# Altium PCB AVR Test Hat.PcbDoc
Units mm, origin at the board's own origin, x right, y up, seen from the top; angles counter-clockwise.
Board outline 65 x 56 mm, 2 copper layers (Top Layer, Bottom Layer), stack 1.58 mm thick; 65 components, 70 nets, 304 pads, 155 vias.
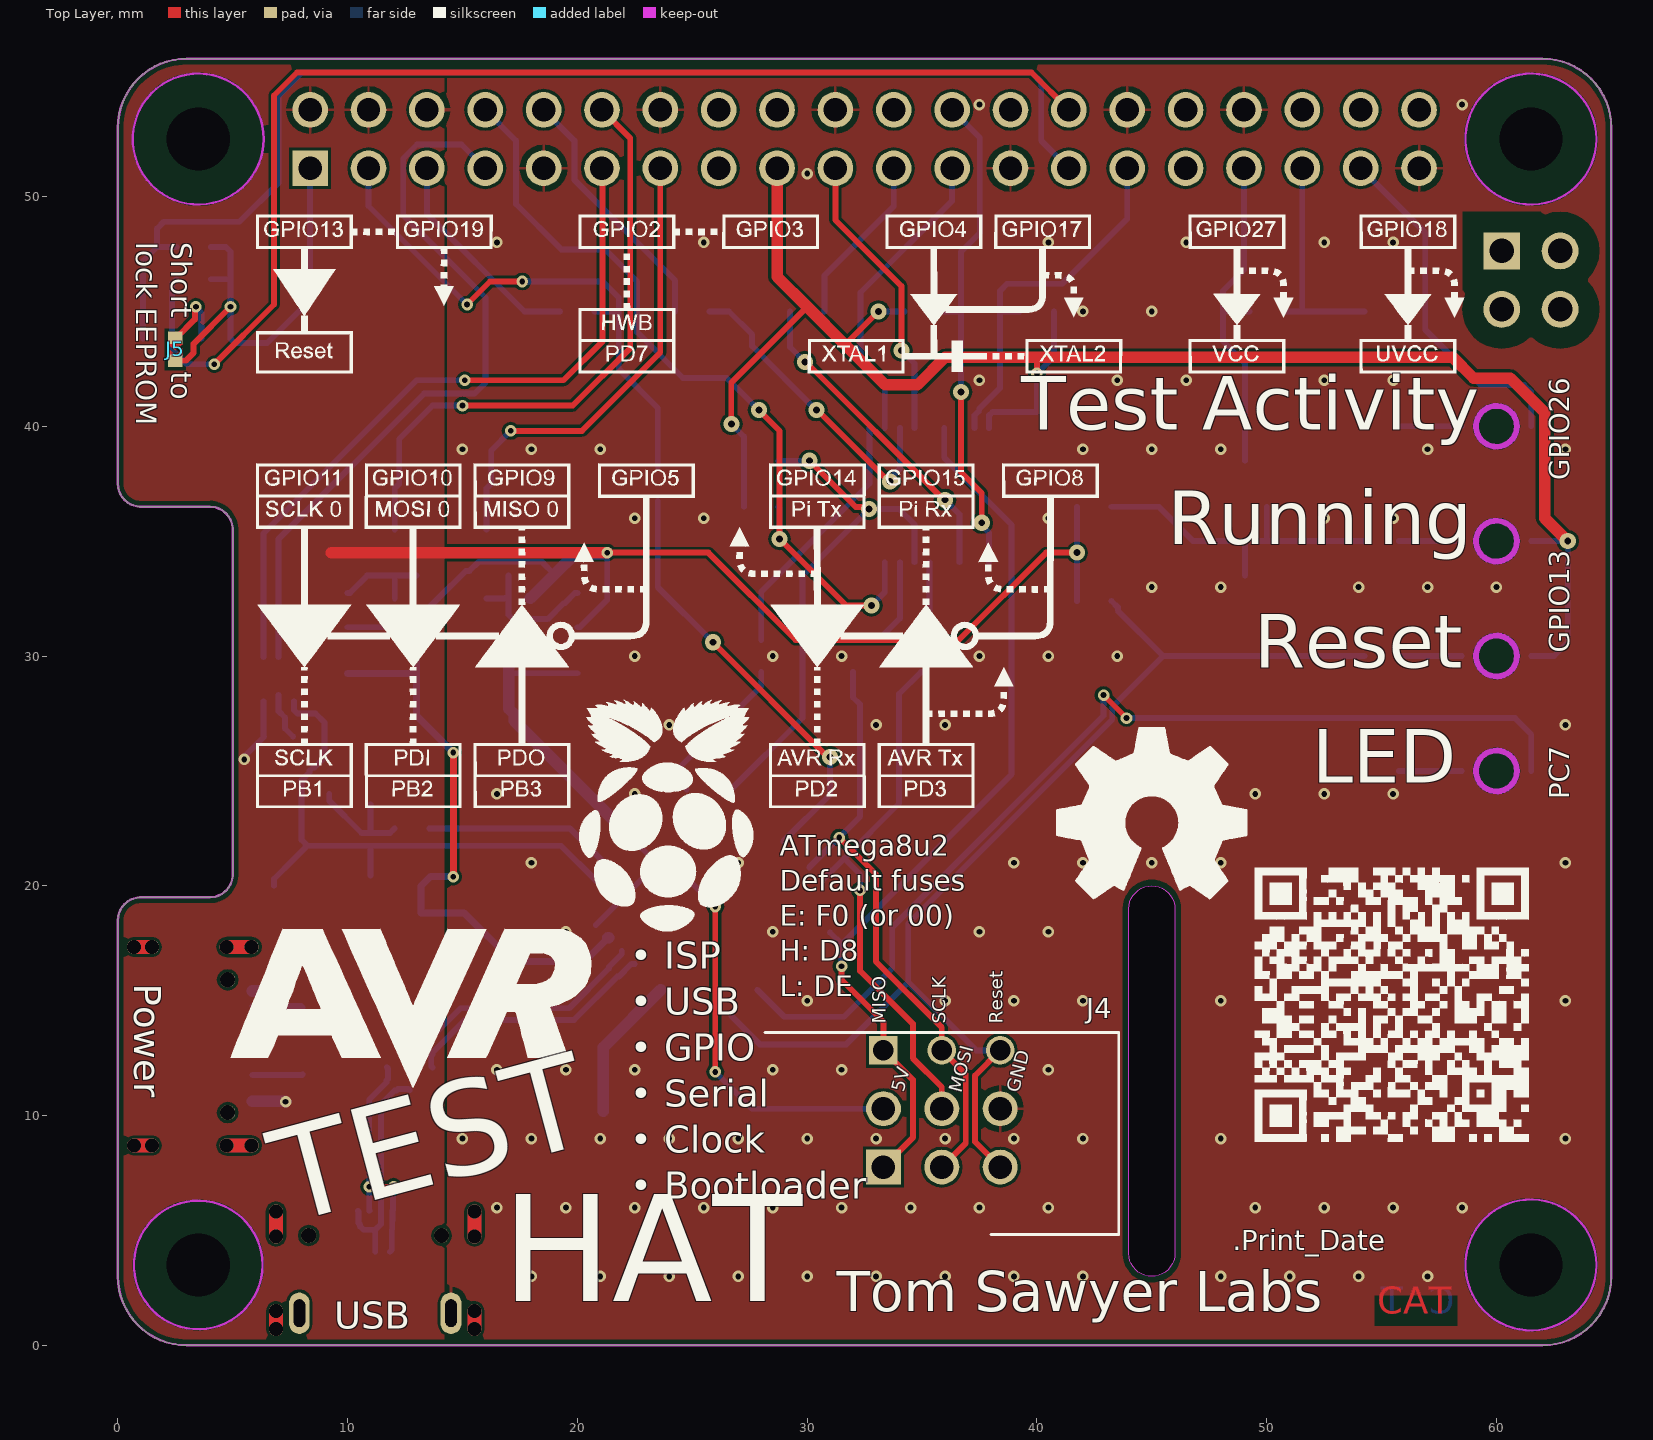
[diagram p0: Top Layer view]
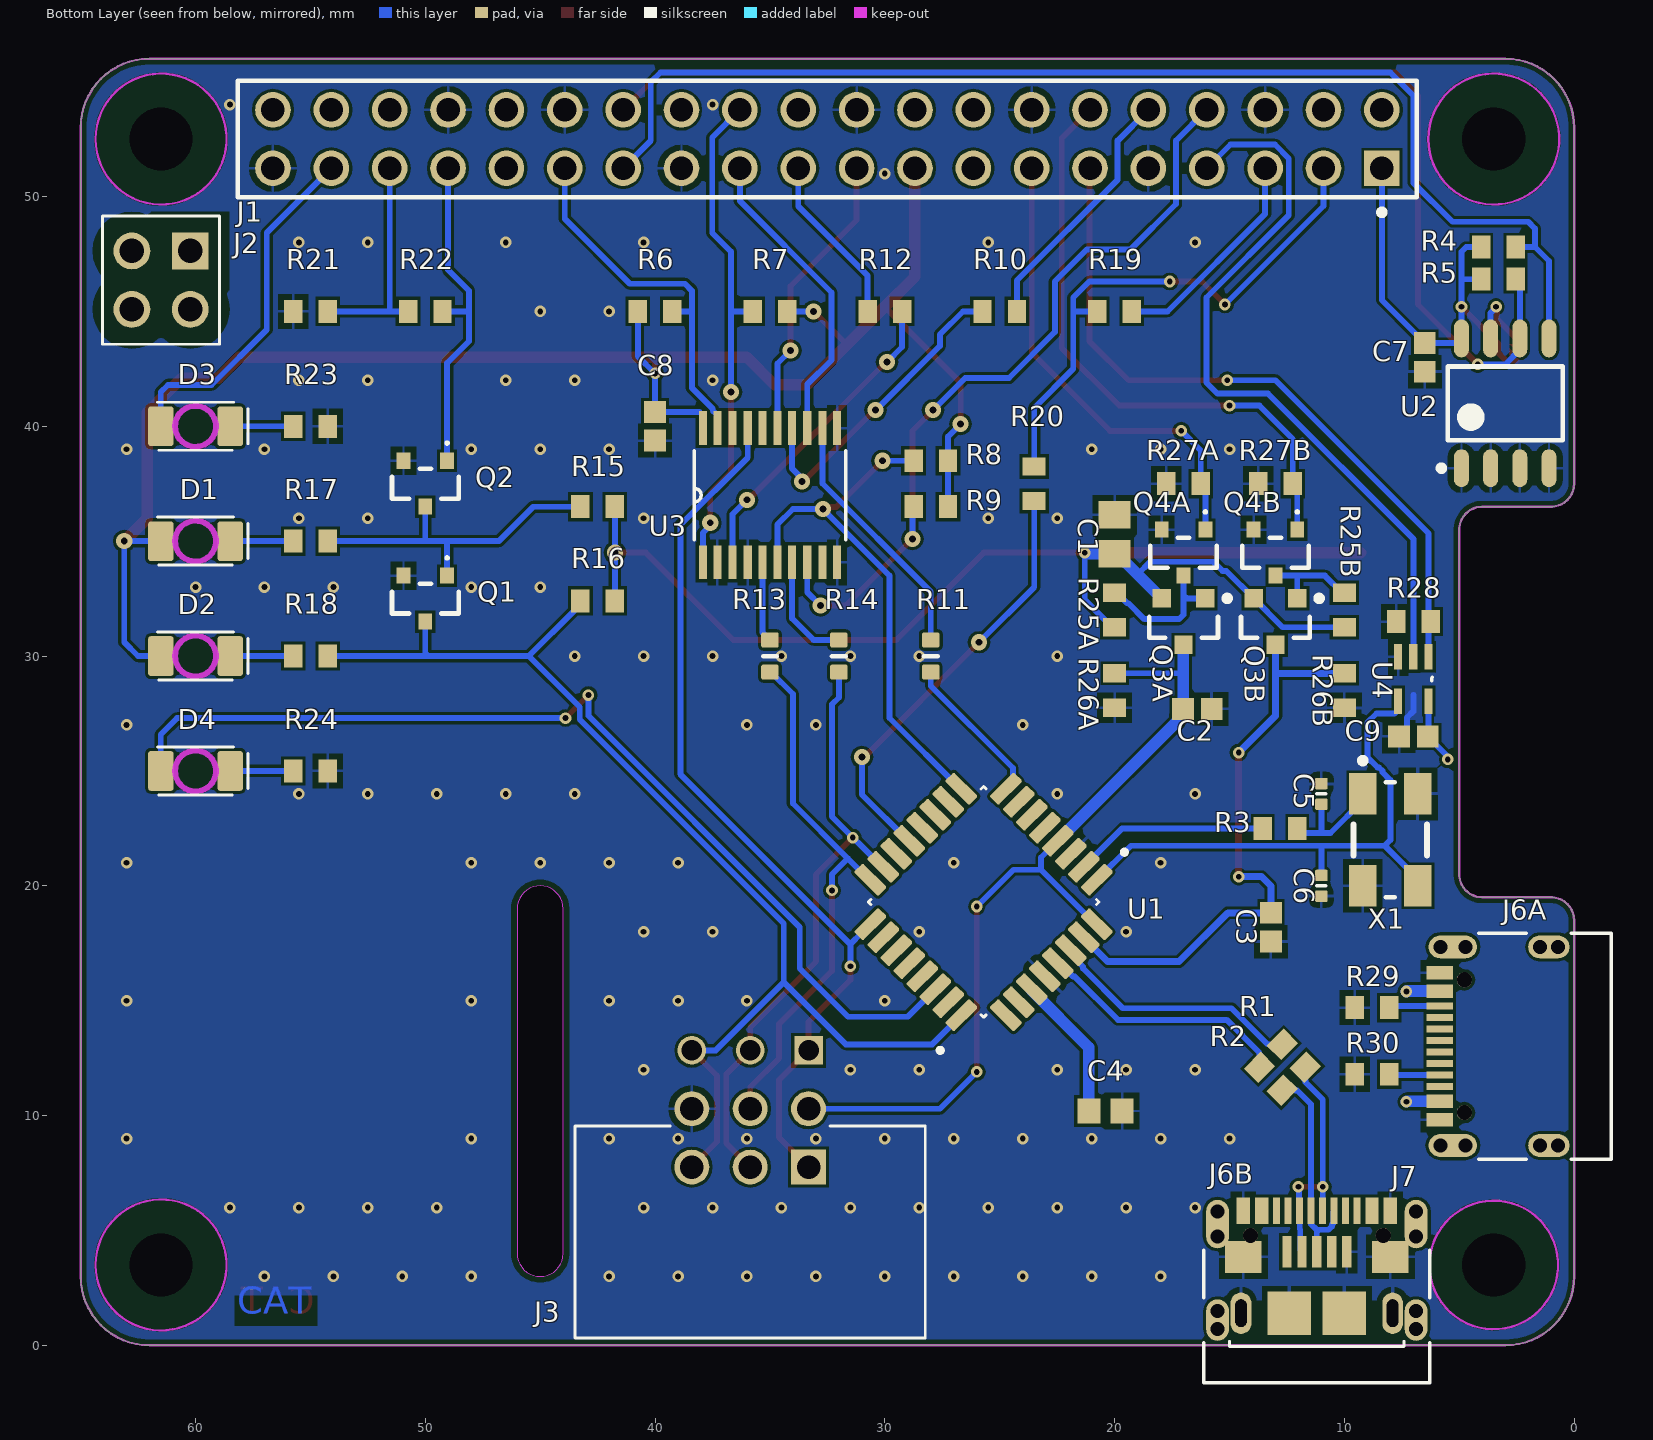
[diagram p1: Bottom Layer view, seen from below]
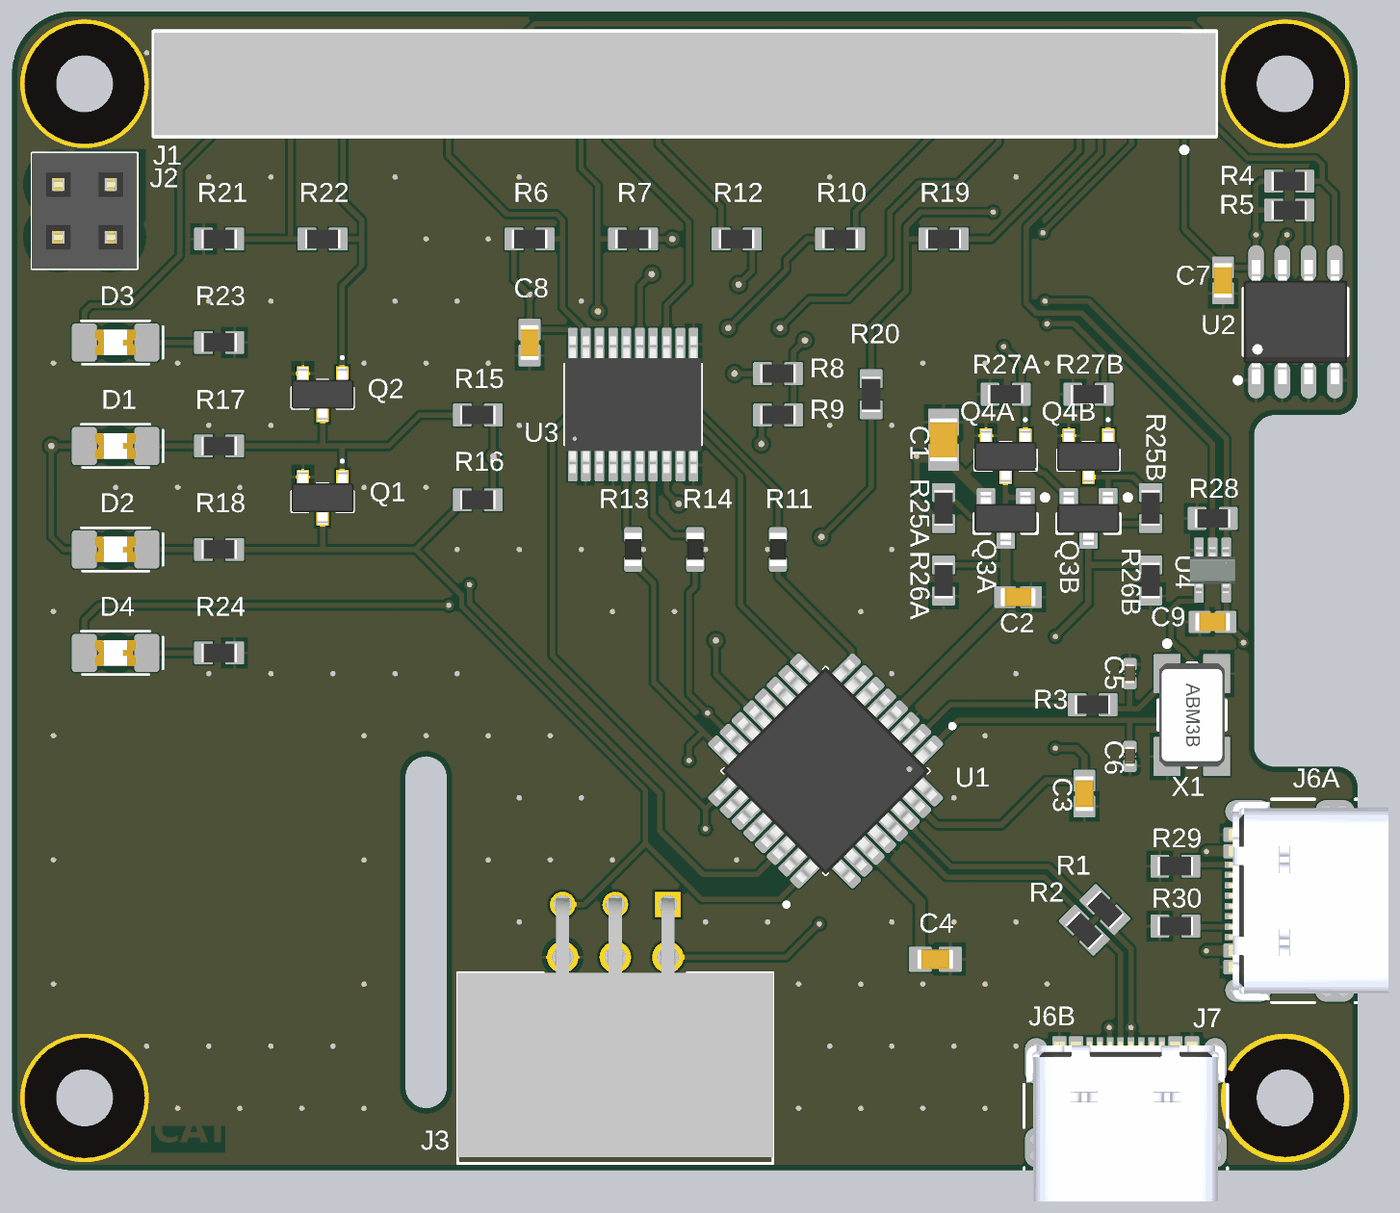
[diagram p2: 3D render of the assembled board from below, using the file's embedded part models]

## Layer stack, top to bottom
Top Solder: solder mask 0.0102, Solder Resist, Dk 3.5
Top Layer: signal copper 0.0356
Dielectric 1: dielectric 1.5086, FR-4, Dk 4.8
Bottom Layer: signal copper 0.0356
Bottom Solder: solder mask 0.0102, Solder Resist, Dk 3.5

## Board outline
0,3 0,18.5 cw(c1,18.5) 1,19.5 4,19.5 ccw(c4,20.5) 5,20.5 5,35.5 ccw(c4,35.5) 4,36.5 1,36.5 cw(c1,37.5) 0,37.5 0,53 cw(c3,53) 3,56 62,56 cw(c62,53) 65,53 65,3 cw(c62,3) 62,0 3,0 cw(c3,3)
cut-out: 44,19 cw(c45,19) 45,20 cw(c45,19) 46,19 46,4 cw(c45,4) 45,3 cw(c45,4) 44,4

## Design rules (kind name [scope] priority, off if disabled: settings)
BoardOutlineClearance [All] p1: gap=0.254 ignorepadtopadclearanceinfootprint=FALSE
Clearance Clearance_PoE [InComponent('J2')] p1: gap=0.9 ignorepadtopadclearanceinfootprint=TRUE
Clearance Clearance_KeepOut [All vs OnLayer('Keep-Out Layer')] p2: gap=0 ignorepadtopadclearanceinfootprint=TRUE
Clearance [All] p3: gap=0.127 ignorepadtopadclearanceinfootprint=TRUE
ComponentClearance [InComponent('K1') vs InComponentClass('All Components')] p1: gap=0.254 collisioncheckmode=3 verticalgap=0.254 showdistances=FALSE
ComponentClearance ComponentClearance_DisableOther [InComponent('K1')] p2: gap=0 collisioncheckmode=3 verticalgap=0 showdistances=FALSE
DiffPairsRouting [All] p1: maxlimit=0.254 minlimit=0.127 mostfreqgap=0.254 toplayer_minwidth=0.127 toplayer_maxwidth=0.381 toplayer_prefwidth=0.381 bottomlayer_minwidth=0.127 bottomlayer_maxwidth=0.381 bottomlayer_prefwidth=0.381 filterlayerstackid={A4766FD5-E70D-4C0C-86B7-53E984FAE464} maxuncoupledlength=12.7
FanoutControl Fanout_LCC [IsLCC] p1: bgadir=Out bgaviamode=Centered fanoutstyle=Auto fanoutdirection=Alternating viagrid=0.025 // Fanout_LCC (Default Rule)
FanoutControl Fanout_BGA [IsBGA] p2: bgadir=Out bgaviamode=Centered fanoutstyle=Auto fanoutdirection=Alternating viagrid=0.025 // Fanout_BGA (Default Rule)
FanoutControl Fanout_Default [All] p4: bgadir=Out bgaviamode=Centered fanoutstyle=Auto fanoutdirection=Alternating viagrid=0.025 // Fanout_Default (Default Rule)
FanoutControl Fanout_Small [(CompPinCount < 5)] p5: bgadir=Out bgaviamode=Centered fanoutstyle=Auto fanoutdirection=OutThenIn viagrid=0.025 // Fanout_Small (Default Rule)
HoleSize [All] p1: absolutevalues=TRUE maxlimit=5 minlimit=0.25 maxpercent=80.000 minpercent=20.000
PasteMaskExpansion [All] p1: expansion=0.051
PlaneConnect [All] p1: pad.planeconnectstyle=Relief pad.reliefexpansion=0 pad.reliefentries=4 pad.reliefconductorwidth=0.127 pad.reliefairgap=0.254 via.planeconnectstyle=Direct via.reliefexpansion=0.508 via.reliefentries=4 via.reliefconductorwidth=0.254 via.reliefairgap=0.254
PolygonConnect [All] p1: thpad.connectstyle=Relief thpad.reliefconductorwidth=0.127 thpad.reliefentries=4 thpad.polygonreliefangle="90 Angle" thpad.airgapwidth=0.254 smdpad.connectstyle=Relief smdpad.reliefconductorwidth=0.127 smdpad.reliefentries=4 smdpad.polygonreliefangle="90 Angle" smdpad.airgapwidth=0.254 via.connectstyle=Direct via.reliefconductorwidth=0.254 via.reliefentries=4 via.polygonreliefangle="90 Angle" via.airgapwidth=0.254
RoutingVias [All] p1: holewidth=0.25 width=0.504 viastyle="Through Hole" minholewidth=0.25 minwidth=0.504 maxholewidth=0.711 maxwidth=1.27
SilkToSilkClearance [All] p1: silktosilkclearance=0.127
SilkToSolderMaskClearance [All] p1: minsilkscreentomaskgap=0.127 clearancetoexposedcopper=FALSE
SolderMaskExpansion SolderMaskExpansion_Via [IsVia] p1: expansion=0.102 istentingtop=TRUE
SolderMaskExpansion [All] p2: expansion=0.051 istentingtop=FALSE
UnRoutedNet [All] p1: checkbadconnections=TRUE
Width [All] p1: maxlimit=1 minlimit=0.127 preferedwidth=0.254
18 further rules are at their usual default settings.

## Classes and differential pairs
component class USB-C: J6B
component class PWR: J6A
component class micro: J7
component class "Clock Override": C9 R28 U4
channel class "Power Switch": Power USB
component class USB: Q3B Q4B R25B R26B R27B
component class Power: Q3A Q4A R25A R26A R27A
component class Main: D3 D4 R19 R20 R21 R22 R23 R24
channel class USB-C: PWR USB-C
component class Reset: D1 D2 Q1 Q2 R15 R16 R17 R18
component class PullUps: R4 R5
component class LogicLevel: C8 R6 R7 R8 R9 R10 R11 R12 R13 R14 U3
component class EEPROM: C7 IC? J5 U2
component class AVR: C1 C2 C3 C4 C5 C6 J5 R1 R2 R3 U1 X1
component class Pi: J1 J5
pad class "Mounting holes": Free-MNT
differential pair DB: +DB_P -DB_N
differential pair DA: +DA_P -DA_N
differential pair A: +A_P -A_N

## Components (designator, comment, footprint, x,y, rotation, side; value= is the part's Value field where it differs from the comment)
C1 "Capacitor 10 uF +/- 10% 16 V 0805" CAPC2013X135X45NL10T25 20,35.3 r90 bottom value=10µF
C2 "Capacitor 100 nF +/-10% 50 V 0603" CAPC1608X90X40NL10T20 16.4,27.7 r0 bottom value=100nF
C3 "Capacitor 100 nF +/-10% 50 V 0603" CAPC1608X90X40NL10T20 13.2,18.2 r90 bottom value=100nF
C4 "Capacitor 1uF +/- 10% 16V 0603" CAPC1608X90X35ML15T15 20.4,10.2 r180 bottom value=1µF
C5 "Capacitor 12pF +/-10% 50V 0402" CAPC0402(1005)33_L 11,24 r270 bottom value=12pF
C6 "Capacitor 12pF +/-10% 50V 0402" CAPC0402(1005)33_L 11,20 r90 bottom value=12pF
C7 "Capacitor 100 nF +/-10% 50 V 0603" CAPC1608X90X40NL10T20 6.5,43 r90 bottom value=100nF
C8 "Capacitor 100 nF +/-10% 50 V 0603" CAPC1608X90X40NL10T20 40,40 r90 bottom value=100nF
C9 "Capacitor 100 nF +/-10% 50 V 0603" CAPC1608X90X40NL10T20 7,26.5 r180 bottom value=100nF
D1 "LTST-C230KFKT" LEDC3216X110 60,35 r0 bottom
D2 "LTST-C230KFKT" LEDC3216X110 60,30 r0 bottom
D3 "LTST-C230KFKT" LEDC3216X110 60,40 r0 bottom
D4 "LTST-C230KFKT" LEDC3216X110 60,25 r0 bottom
J1 "Harwin M20-7832046" PCB-677180-1 32.5,52.5 r180 bottom locked
J2 "PPPC022LFBN-RC" SULLINS_PPPC022LFBN-RC 61.5,46.36 r90 bottom
J3 "2-1761605-1" TE_2-1761605-1 33.32,12.84 r0 bottom
J4 "30306-6002HB" 3M_30306-6002HB 33.32,7.76 r90 top
J5 "JUMPER" JUMPER 2.5,43.4 r180 top
J6A "USB4105-GF-A" USB4105_GCT 2.369,13.02 r90 bottom (schematic designator J6)
J6B "USB4105-GF-A" USB4105_GCT 11.2,2.37 r180 bottom (schematic designator J6)
J7 "10118193-0001LF" AMPHENOL_10118193-0001LF 11.2,1.4 r180 bottom
Q1 "2N7002,215" NXP-SOT23-3_V 50,32.5 r270 bottom
Q2 "2N7002,215" NXP-SOT23-3_V 50,37.5 r270 bottom
Q3A "CJ2305" JSCJ-SOT23-3_V 17,31.5 r270 bottom (schematic designator Q3)
Q3B "CJ2305" JSCJ-SOT23-3_V 13,31.5 r270 bottom (schematic designator Q3)
Q4A "2N7002,215" NXP-SOT23-3_V 17,34.5 r270 bottom (schematic designator Q4)
Q4B "2N7002,215" NXP-SOT23-3_V 13,34.5 r270 bottom (schematic designator Q4)
R1 "Resistor 22R +/-1% 0603 100 mW" RESC1609X50X30ML08T20 12.2,12.6 r45 bottom value=22
R2 "Resistor 22R +/-1% 0603 100 mW" RESC1609X50X30ML08T20 13.2,11.6 r45 bottom value=22
R3 "Resistor 1k +/-1% 0603 100 mW" RESC1608X55X25ML10T15 12.8,22.5 r0 bottom value=1k
R4 "Resistor 1k +/-1% 0603 100 mW" RESC1608X55X25ML10T15 3.3,47.8 r0 bottom value=1k
R5 "Resistor 1k +/-1% 0603 100 mW" RESC1608X55X25ML10T15 3.3,46.4 r0 bottom value=1k
R6 "Resistor 1k +/-1% 0603 100 mW" RESC1608X55X25ML10T15 40,45 r0 bottom value=1k
R7 "Resistor 1k +/-1% 0603 100 mW" RESC1608X55X25ML10T15 35,45 r180 bottom value=1k
R8 "Resistor 1k +/-1% 0603 100 mW" RESC1608X55X25ML10T15 28,38.5 r180 bottom value=1k
R9 "Resistor 1k +/-1% 0603 100 mW" RESC1608X55X25ML10T15 28,36.5 r180 bottom value=1k
R10 "Resistor 1k +/-1% 0603 100 mW" RESC1608X55X25ML10T15 25,45 r0 bottom value=1k
R11 "Resistor 120R +/-5 % 0603 0.1 W" RESC0603(1608)_L 28,30 r270 bottom value=120
R12 "Resistor 1k +/-1% 0603 100 mW" RESC1608X55X25ML10T15 30,45 r180 bottom value=1k
R13 "Resistor 120R +/-5 % 0603 0.1 W" RESC0603(1608)_L 35,30 r270 bottom value=120
R14 "Resistor 120R +/-5 % 0603 0.1 W" RESC0603(1608)_L 32,30 r270 bottom value=120
R15 "Resistor 1k +/-1% 0603 100 mW" RESC1608X55X25ML10T15 42.5,36.5 r180 bottom value=1k
R16 "Resistor 1k +/-1% 0603 100 mW" RESC1608X55X25ML10T15 42.5,32.4 r180 bottom value=1k
R17 "Resistor 1k +/-1% 0603 100 mW" RESC1608X55X25ML10T15 55,35 r0 bottom value=1k
R18 "Resistor 1k +/-1% 0603 100 mW" RESC1608X55X25ML10T15 55,30 r0 bottom value=1k
R19 "Resistor 1k +/-1% 0603 100 mW" RESC1608X55X25ML10T15 20,45 r180 bottom value=1k
R20 "Resistor 1k +/-1% 0603 100 mW" RESC1608X55X25ML10T15 23.5,37.5 r90 bottom value=1k
R21 "Resistor 1k +/-1% 0603 100 mW" RESC1608X55X25ML10T15 55,45 r180 bottom value=1k
R22 "Resistor 1k +/-1% 0603 100 mW" RESC1608X55X25ML10T15 50,45 r0 bottom value=1k
R23 "Resistor 1k +/-1% 0603 100 mW" RESC1608X55X25ML10T15 55,40 r0 bottom value=1k
R24 "Resistor 1k +/-1% 0603 100 mW" RESC1608X55X25ML10T15 55,25 r0 bottom value=1k
R25A "Resistor 1k +/-1% 0603 100 mW" RESC1608X55X25ML10T15 20,32 r270 bottom value=1k (schematic designator R25)
R25B "Resistor 1k +/-1% 0603 100 mW" RESC1608X55X25ML10T15 10,32 r270 bottom value=1k (schematic designator R25)
R26A "Resistor 1k +/-1% 0603 100 mW" RESC1608X55X25ML10T15 20,28.5 r90 bottom value=1k (schematic designator R26)
R26B "Resistor 1k +/-1% 0603 100 mW" RESC1608X55X25ML10T15 10,28.5 r90 bottom value=1k (schematic designator R26)
R27A "Resistor 1k +/-1% 0603 100 mW" RESC1608X55X25ML10T15 17,37.5 r180 bottom value=1k (schematic designator R27)
R27B "Resistor 1k +/-1% 0603 100 mW" RESC1608X55X25ML10T15 13,37.5 r180 bottom value=1k (schematic designator R27)
R28 "Resistor 1k +/-1% 0603 100 mW" RESC1608X55X25ML10T15 7,31.5 r180 bottom value=1k
R29 "Resistor 1k +/-1% 0603 100 mW" RESC1608X55X25ML10T15 8.8,14.7 r180 bottom value=1k
R30 "Resistor 1k +/-1% 0603 100 mW" RESC1608X55X25ML10T15 8.8,11.8 r180 bottom value=1k
U1 "ATMEGA16U2-AU" QFP80P900X900X120-32N 25.7,19.3 r315 bottom
U2 "CAT24C32WI-GT3" ONSC-SOIC-8-751BD-01_M 3,41 r90 bottom
U3 "74LVC244APW,118" SOP65P640X110-20N 35,37 r90 bottom
U4 "74AHCT1G126SE-7" SOT65P210X110-5N 7,29 r270 bottom
X1 "ABM3B-16.000MHZ-B2-T" ABRA-ABM3B-4_V 8,22 r270 bottom

## Footprints (in the part's own frame and the unit in brackets; to place one, negate y for a bottom-side part, rotate by r counter-clockwise, add the part's x,y. Pads: shape width x height; smd on the part's side, far side on the other; paste and mask are expansions set on the pad)
3M_30306-6002HB [mm]
  rect 1.52x1.52 hole 1.02: 1(0,0)
  round 1.52 hole 1.02: 2(2.54,0) 3(0,-2.54) 4(2.54,-2.54) 5(0,-5.08) 6(2.54,-5.08)
  silkscreen extent -2.93,-10.24 5.85,5.16, body extent -2.92,-10.16 5.84,5.08, height 9.14
ABRA-ABM3B-4_V [mm] "SMD, 4-Leads, Body 5x3.2mm"
  rect 1.8x1.2 smd: 1(-2,-1.2) 2(2,-1.2) 3(2,1.2) 4(-2,1.2)
  silkscreen extent -3.57,-1.6 2.5,1.6, body extent -2.5,-1.59 2.5,1.59, height 1.13
AMPHENOL_10118193-0001LF [mm]
  rect 0.4x1.35 smd: 1(-1.3,2.675) 2(-0.65,2.675) 3(0,2.675) 4(0.65,2.675) 5(1.3,2.675)
  rect 1.6x1.4 smd: S1(-3.2,2.45) S2(3.2,2.45)
  rect 1.9x1.9 smd: S3(1.2,0) S4(-1.2,0)
  oval 0.9x1.8 hole 0.5 slot 1.2 at 90 deg: S5(-3.3,0) S6(3.3,0)
  silkscreen extent -3.8,-1.45 3.8,-1.22, body extent -3.92,-2.7 3.94,2.96, height 2.86
CAPC0402(1005)33_L [mm] "Chip Capacitor, Body 1.0x0.5mm, Height 0.33mm, IPC High Density"
  rrect25% 0.5x0.55 smd: 1(-0.45,0) 2(0.45,0)
  silkscreen extent 0,-0.2 0,0.2, body extent -0.5,-0.25 0.5,0.25, height 0.55
CAPC1608X90X35ML15T15 [mm] "Chip Capacitor, 2-Leads, Body 1.75x0.95mm, IPC Low Density"
  rect 1x1.1 smd: 1(-0.725,0) 2(0.725,0)
  body extent -0.87,-0.48 0.87,0.48, height 0.9
CAPC1608X90X40NL10T20 [mm] "Chip Capacitor, 2-Leads, Body 1.70x0.90mm, IPC Medium Density"
  rect 0.95x0.95 smd: 1(-0.625,0) 2(0.625,0)
  body extent -0.85,-0.45 0.85,0.45, height 0.9
CAPC2013X135X45NL10T25 [mm] "Chip Capacitor, 2-Leads, Body 2.10x1.35mm, IPC Medium Density"
  rect 1.2x1.4 smd: 1(-0.85,0) 2(0.85,0)
  body extent -1.05,-0.67 1.05,0.67, height 1.35
JSCJ-SOT23-3_V [mm] "SOT23, 3-Leads, Body 3x1.4mm, Pitch 0.95mm"
  rect 0.8x0.8 smd: 1(-1.01,0.95) 2(-1.01,-0.95) 3(1.01,0)
  silkscreen extent -1.13,-1.5 0.7,2.02, body extent -1.28,-1.5 1.28,1.5, height 1.15
JUMPER [mm]
  rect 0.65x0.55 smd paste-2.54 mask-2.54: 1(0,-0.45) 2(0,0.55)
  Top Layer region: -0.325,-0.175 0,0.1 0.325,-0.175
  Top Layer region: -0.325,0 0,0.284 0.325,0 0.325,0.318 -0.325,0.317
LEDC3216X110 [mm]
  rrect20% 1.1x1.73 smd: A(1.51,0) C(-1.51,0)
  Keep-Out Layer circle w0.254: c0,0 r0.889
  silkscreen extent -2.29,-1.04 1.65,1.04, body extent -1,-0.63 1,0.63, height 0.3
NXP-SOT23-3_V [mm] "SOT23, 3-Leads, Body 2.9x1.3mm, Pitch 0.95mm"
  rect 0.7x0.6 smd paste-0.05: 1(-1,0.95) 2(-1,-0.95) 3(1,0)
  silkscreen extent -1.79,-1.45 0.65,1.45, body extent -1.3,-1.5 1.3,1.5, height 1.1
ONSC-SOIC-8-751BD-01_M [mm] "SOIC, 8-Leads, Body 5x4mm, Pitch 1.27mm, IPC Low Density"
  oval 1.65x0.65 smd: 1(-2.825,1.905) 2(-2.825,0.635) 3(-2.825,-0.635) 4(-2.825,-1.905) 5(2.825,-1.905) 6(2.825,-0.635) 7(2.825,0.635) 8(2.825,1.905)
  silkscreen extent -2.95,-2.5 1.6,2.91, body extent -3,-2.5 3,2.5, height 1.75
PCB-677180-1 [mm] "SAMTEC_SSQ-120-01-T-D"
  rect 1.55x1.55 hole 1.02: 1(24.13,-1.27)
  round 1.55 hole 1.02: 2(24.13,1.27) 3(21.59,-1.27) 4(21.59,1.27) 5(19.05,-1.27) 6(19.05,1.27) 7(16.51,-1.27) 8(16.51,1.27) 9(13.97,-1.27) 10(13.97,1.27) 11(11.43,-1.27) 12(11.43,1.27) 13(8.89,-1.27) 14(8.89,1.27) 15(6.35,-1.27) 16(6.35,1.27) 17(3.81,-1.27) 18(3.81,1.27) 19(1.27,-1.27) 20(1.27,1.27) 21(-1.27,-1.27) 22(-1.27,1.27) 23(-3.81,-1.27) 24(-3.81,1.27) 25(-6.35,-1.27) 26(-6.35,1.27) 27(-8.89,-1.27) 28(-8.89,1.27) 29(-11.43,-1.27) 30(-11.43,1.27) 31(-13.97,-1.27) 32(-13.97,1.27) 33(-16.51,-1.27) 34(-16.51,1.27) 35(-19.05,-1.27) 36(-19.05,1.27) 37(-21.59,-1.27) 38(-21.59,1.27) 39(-24.13,-1.27) 40(-24.13,1.27)
  silkscreen extent -25.65,-3.32 25.65,2.54, body extent -25.65,-2.48 25.65,2.48, height 8.51
QFP80P900X900X120-32N [mm]
  rrect25% 1.49x0.55 smd: 1(-4.17,2.8) 2(-4.17,2) 3(-4.17,1.2) 4(-4.17,0.4) 5(-4.17,-0.4) 6(-4.17,-1.2) 7(-4.17,-2) 8(-4.17,-2.8) 17(4.17,-2.8) 18(4.17,-2) 19(4.17,-1.2) 20(4.17,-0.4) 21(4.17,0.4) 22(4.17,1.2) 23(4.17,2) 24(4.17,2.8)
  rrect25% 0.55x1.49 smd: 9(-2.8,-4.17) 10(-2,-4.17) 11(-1.2,-4.17) 12(-0.4,-4.17) 13(0.4,-4.17) 14(1.2,-4.17) 15(2,-4.17) 16(2.8,-4.17) 25(2.8,4.17) 26(2,4.17) 27(1.2,4.17) 28(0.4,4.17) 29(-0.4,4.17) 30(-1.2,4.17) 31(-2,4.17) 32(-2.8,4.17)
  silkscreen extent -5.96,-3.55 3.55,3.55, body extent -4.62,-4.62 4.62,4.62, height 1.2
RESC0603(1608)_L [mm] "Chip Resistor, Body 1.6x0.8mm, IPC High Density"
  rrect25% 0.66x0.76 smd: 1(-0.7,0) 2(0.7,0)
  silkscreen extent 0,-0.3 0,0.3, body extent -0.8,-0.4 0.8,0.4, height 0.45
RESC1608X55X25ML10T15 [mm] "Chip Resistor, 2-Leads, Body 1.70x0.90mm, IPC Low Density"
  rect 0.8x1 smd: 1(-0.75,0) 2(0.75,0)
  body extent -0.85,-0.45 0.85,0.45, height 0.55
RESC1609X50X30ML08T20 [mm] "Chip Resistor, 2-Leads, Body 1.65x0.95mm, IPC Low Density"
  rect 0.9x1.05 smd: 1(-0.7,0) 2(0.7,0)
  body extent -0.82,-0.47 0.82,0.47, height 0.5
SOP65P640X110-20N [mil]
  rect 58x14 smd: 1(-115,115) 2(-115,90) 3(-115,64) 4(-115,38) 5(-115,13) 6(-115,-13) 7(-115,-38) 8(-115,-64) 9(-115,-90) 10(-115,-115) 11(115,-115) 12(115,-90) 13(115,-64) 14(115,-38) 15(115,-13) 16(115,13) 17(115,38) 18(115,64) 19(115,90) 20(115,115)
  silkscreen extent -76,-130 76,130, body extent -130,-130 130,130, height 43
SOT65P210X110-5N [mil]
  rect 44x14 smd: 1(-38,26) 2(-38,0) 3(-38,-26) 4(38,-26) 5(38,26)
  silkscreen extent -3,32 3,32, body extent -44,-44 44,44, height 43
SULLINS_PPPC022LFBN-RC [mm]
  rect 1.605x1.605 hole 1.07: 1(1.27,-1.27)
  round 1.605 hole 1.07: 2(1.27,1.27) 3(-1.27,-1.27) 4(-1.27,1.27)
  silkscreen extent -2.79,-2.54 2.79,2.54, body extent -2.79,-2.54 2.79,2.54, height 8.51
TE_2-1761605-1 [mm]
  rect 1.24x1.24 hole 0.89: 1(0,0)
  round 1.24 hole 0.89: 2(0,2.54) 3(2.54,0) 4(2.54,2.54) 5(5.08,0) 6(5.08,2.54)
  silkscreen extent -5.83,-0.1 10.16,12.51, body extent -5.08,-0.32 10.16,12.19, height 9.22
USB4105_GCT [mil]
  oval 39x71 smd: 13(-170.08,-49.97) 14(170.08,-49.97)
  oval 39x83 smd: 15(-170.08,114.6) 16(170.08,114.6)
  round 26 hole 26 unplated: 17(-113.78,94.91) 18(113.78,94.91)
  rect 23x45 smd: A1-B12(-125.98,137.24) A4-B9(-94.49,137.24) B1-A12(125.98,137.24) B4-A9(94.49,137.24)
  rect 12x45 smd paste+0 mask+0: A5(-49.21,137.24) A6(-9.84,137.24) A7(9.84,137.24) A8(49.21,137.24) B5(68.9,137.24) B6(29.53,137.24) B7(-29.53,137.24) B8(-68.9,137.24)
  round 24 hole 24 unplated: S_1_H1(-170.08,-34.47) S_1_H2(-170.08,-65.47) S_2_H1(170.08,-34.47) S_2_H2(170.08,-65.47) S_3_H1(-170.08,136.1) S_3_H2(-170.08,93.1) S_4_H1(170.08,136.1) S_4_H2(170.08,93.1)
  Multi-Layer lines w24: -170.08,-65.47 -170.08,-34.47 ; 170.08,-65.47 170.08,-34.47 ; -170.08,93.1 -170.08,136.1 ; 170.08,93.1 170.08,136.1
  silkscreen extent -194,-157 194,70, body extent -189,-152 189,151, height 130

## Part data
C1: library part CMP-001-00015-6, "Chip Capacitor, 10 uF, +/- 10%, 16 V, 0805 (2012 Metric)", Capacitor Type=Ceramic, Case/Package=0805, Max Operating Temperature=85°C, Min Operating Temperature=-55°C, Tolerance=10%, Voltage Rating=16V, Mounting Technology=SM, Pins=2, RoHS Compliant=True
C2 C3 C7 C8 C9: library part CMP-001-00017-6, "Chip Capacitor, 100 nF, +/- 10%, 50 V, 0603 (1608 Metric)", Capacitor Type=Ceramic, Case/Package=0603, Max Operating Temperature=125°C, Min Operating Temperature=-55°C, Tolerance=10%, Voltage Rating=50V, Mounting Technology=SM, Pins=2, RoHS Compliant=True
C4: library part CMP-001-00004-6, "Chip Capacitor, 1 uF, +/- 10%, 16 V, 0603 (1608 Metric)", Capacitor Type=Ceramic, Case/Package=0603, Max Operating Temperature=125°C, Min Operating Temperature=-55°C, Tolerance=10%, Voltage Rating=16V, Mounting Technology=SM, Pins=2, RoHS Compliant=True
C5 C6: library part CMP-001-00072-4, "Chip Capacitor, 12pF +/-10%, 50V, 0402, Thickness 0.33 mm", Case/Package=0402, Max Operating Temperature=85°C, Min Operating Temperature=-55°C, Tolerance=20%, Voltage Rating=50V, Mounting Technology=SMT, Pins=2
D1 D2 D3 D4: library part CMP-010-000000-1, "Orange 605nm LED Indication - Discrete 2V 1206 (3216 Metric)", Package="1206 Lite-On", Availability=Unavailable, Component Type=Standard, Design Item ID=LTST-C230KFKT, MF="Lite-On Inc.", MP=LTST-C230KFKT, Pin Count=2, Price=None, SnapEDA_Link=https://www.snapeda.com/parts/LTST-C230KFKT/Lite-On%20Inc./view-part/353318/?ref=snap, Source=LTST-C230KFKT.SchLib
J1: library part CMP-2482621-3, "Headers & Wire Housings 20+20 DIL VERTICAL SOCKET TIN", Color=Black, Contact Resistance="0.015 Ω", Current Rating="3.0 A", Insulation Resistance="1000000.0 Ω", Contact Material="Phosphor Bronze", Contact Plating=Tin, Gender=Female, Material=Polyester, Number of Contacts=40, Number of Mating Cycles=50, Number of Rows=2, Octopart Url=https://octopart.com/m20-7832046-harwin-5372736, OctopartID=2d85e4def3a3f242, Pin Pitch="0.00254 m", REACH SVHC Compliance="No SVHC", RoHS=Compliant
J2: library part CMP-026-000000-1, "4 Position Header Connector 0.100 (2.54mm) Through Hole Gold", Package=None, Availability="In Stock", Check_prices=https://www.snapeda.com/parts/PPPC022LFBN-RC/Sullins+Connector+Solutions/view-part/?ref=eda, Component Type=Standard, Design Item ID=PPPC022LFBN-RC, MF="Sullins Connector Solutions", MP=PPPC022LFBN-RC, Pin Count=4, Price=None, Purchase-URL=https://pricing.snapeda.com/search/part/PPPC022LFBN-RC/?ref=eda, SnapEDA_Link=https://www.snapeda.com/parts/PPPC022LFBN-RC/Sullins+Connector+Solutions/view-part/?ref=snap, Source=PPPC022LFBN-RC.SchLib
J3: library part CMP-014-000000-2, "Wire-To-Board Connector, AMP-LATCH Series, Through Hole, Header, 6, 2.54 mm, Gold Plated Contacts", Package=None, Availability=Unavailable, Component Type=Standard, Design Item ID=2-1761605-1, MF="TE Connectivity", MP=2-1761605-1, Pin Count=6, Price=None, SnapEDA_Link=https://www.snapeda.com/parts/2-1761605-1/TE%20Connectivity%20AMP%20Connectors/view-part/2778412/?ref=snap, Source=SnapEDAsch.SchLib
J4: library part CMP-024-000000-2, "Connector Header Through Hole 6 position 0.100 _2.54mm_", Package=None, Availability=Unavailable, Component Type=Standard, Design Item ID=30306-6002HB, MF=3M, MP=30306-6002HB, Pin Count=6, Price=None, SnapEDA_Link=https://www.snapeda.com/parts/30306-6002HB/3M%20%28TC%29/view-part/542808/?ref=snap, Source=SnapEDAsch.SchLib
J5: library part CMP-009-00061-2, Pins=2
J6A J6B: library part CMP-022-000000-1, "No Description Available", Mfr_Name="Global Connector Technology", Copyright="Copyright (C) 2023 Ultra Librarian. All rights reserved.", Design Item ID=USB4105-GF-A, Digi-Key_Part_Number_1=2073-USB4105-GF-ACT-ND, Digi-Key_Part_Number_2=2073-USB4105-GF-ADKR-ND, Digi-Key_Part_Number_3=2073-USB4105-GF-ATR-ND, Manufacturer_Part_Number=USB4105-GF-A, RefDes=RefDes, Source=USB4105-GF-A.SchLib, Type=DEV
J7: library part CMP-020-000000-2, "Micro USB 2.0, Input Output Connectors, B TYPE RECEPTACLE", Package=None, Availability="In Stock", Check_prices=https://www.snapeda.com/parts/10118193-0001LF/Amphenol+FCI/view-part/?ref=eda, Component Type=Standard, Design Item ID=10118193-0001LF, MF="Amphenol ICC", MP=10118193-0001LF, Pin Count=11, Price=None, Purchase-URL=https://pricing.snapeda.com/search/part/10118193-0001LF/?ref=eda, SnapEDA_Link=https://www.snapeda.com/parts/10118193-0001LF/Amphenol+FCI/view-part/?ref=snap, Source=10118193-0001LF.SchLib
Q1 Q2 Q4A Q4B: library part CMP-013-00011-4, "N-channel Trench MOSFET, 60 V, 300 mA, -65 to 150 degC, 3-Pin SOT-23 (TO-236AB), RoHS, Tape and Reel", Case/Package=TO-236-3, Input Capacitance=50pF, Manufacturer="NXP Semiconductors", Max Dual Supply Voltage=60V, Max Operating Temperature=150°C, Min Operating Temperature=-65°C, Package Description="3-Pin Small Outline Transistor, Body 1.3 x 2.9 mm, Pitch 0.95 mm", Package Quantity=1, Package Reference=SOT23-3, Package Version=Feb-16, Power=830mW, Datasheet URL=http://www.nxp.com/documents/data_sheet/2N7002.pdf, Datasheet Version="Rev. 7, 09/2011", Elements=1, Mounting Technology=SM, Nominal Dual Supply Voltage=60V, Nominal Vgs=2V, Packaging=TapeandReel, Pins=8, Rds On Max=5Ohm, RoHS Compliant=True, Vds Max=60V
Q3A Q3B: library part CMP-013-00015-3, "P-Channel Plastic Encapsulate MOSFET, 12 V, 4.1 A, 3-Pin SOT23, Tape and Reel", Case/Package=SOT23-3, Manufacturer="Jiangsu Changjiang Electronics Technology", Package Description="3-Pin Small Outline Transistor, Body 2.9 x 1.3 mm, Pitch 0.95 mm", Package Version="Rev. E, 09/2009", Datasheet URL=http://www.cj-elec.com/gallery/txUpfile/5140ba9ed47d18467ea4bddc055cd747.pdf, Datasheet Version="Rev. F, 04/2015", Mounting Technology=SM, Package Reference=SOT23-3, RoHS Compliant=Unknown
R1 R2: library part CMP-009-00027-5, "Chip Resistor, 22 Ohm, +/- 1%, 100 mW, -55 to 155 degC, 0603 (1608 Metric)", Case/Package=0603, Max Operating Temperature=155°C, Min Operating Temperature=-55°C, Power=100mW, Tolerance=1%, Voltage Rating=75V, Mounting Technology=SM, Pins=2, RoHS Compliant=True
R3 R4 R5 R6 R7 R8 R9 R10 R12 R15 R16 R17 R18 R19 R20 R21 R22 R23 R24 R25A R25B R26A R26B R27A R27B R28 R29 R30: library part CMP-009-00014-5, "Chip Resistor, 1 KOhm, +/-1%, 0.1 W, -55 to 155 degC, 0603 (1608 Metric)", Case/Package=0603, Max Operating Temperature=155°C, Min Operating Temperature=-55°C, Power=100mW, Tolerance=1%, Voltage Rating=50V, Mounting Technology=SM, Pins=2, RoHS Compliant=True
R11 R13 R14: library part CMP-009-00176-3, "Chip Resistor, 120 Ohms, +/-5 %, 0.1 W, -55 to 155 degC, 0603", Case/Package=0603, Max Operating Temperature=155°C, Min Operating Temperature=-55°C, Power=100mW, Tolerance=5%, Pins=2
U1: library part CMP-012-000000-3, "AVR AVR® ATmega Microcontroller IC 8-Bit 16MHz 16KB FLASH 32-TQFP 7x7", Package="TQFP-32 Microchip", Component Type=Standard, Design Item ID=ATMEGA16U2-AU, Digi-Key_Part_Number=ATMEGA16U2-AU-ND, Digi-Key_Purchase_URL=https://www.digikey.com.tr/product-detail/en/microchip-technology/ATMEGA16U2-AU/ATMEGA16U2-AU-ND/2050947?utm_source=snapeda&utm_medium=aggregator&utm_campaign=symbol, MF=Microchip, MP=ATMEGA16U2-AU, Pin Count=32, SnapEDA_Link=https://www.snapeda.com/parts/ATMEGA16U2-AU/Microchip/view-part/589119/?ref=snap, Source=SnapEDAsch.SchLib
U2: library part CMP-019-00003-3, "I2C CMOS Serial EEPROM, 32 Kb, 1.7 to 5.5 V, -40 to 85 degC, 8-Pin SOIC (751BD), RoHS, Tape and Reel", Case/Package=SOIC, Clock Frequency=100kHz, Frequency=400kHz, Manufacturer="ON Semiconductor", Max Clock Frequency=100KHz, Max Operating Temperature=85°C, Max Supply Voltage=5.5V, Min Operating Temperature=-40°C, Min Supply Voltage=1.7V, Nominal Supply Current=2mA, Package Description="8-Pin Small Outline Integrated Circuit, Body 4.9 x 3.9 mm, Pitch 1.27 mm", Package Quantity=3000, Package Reference=SOIC-8-751BD-01, Access Time=3500ns, Datasheet URL=http://www.onsemi.com/pub_link/Collateral/CAT24C32-D.PDF, Datasheet Version="Rev. 24, 06/2015", Density=32Kb, Interface=Serial, Manufacturer URL=http://www.onsemi.com/, Mounting Technology=SM, Package URL=http://www.onsemi.com/pub_link/Collateral/751BD.PDF, Packaging=TapeandReel, Pins=8, RoHS Compliant=True
U3: library part CMP-008-000000-3, "Octal buffer/line driver", Package=None, Availability=Unavailable, Component Type=Standard, Design Item ID=74LVC244APW,118, MP=74LVC244APW-118, Pin Count=20, Price=None, Source=74LVC244APW,118.SchLib
U4: library part CMP-018-000000-2, "74AHC Series 5.5 V Surface Mount Single Buffer Gate w/ 3-ST Output - SOT-353", Package="SOT-353 Diodes Inc.", Availability=Unavailable, Component Type=Standard, Design Item ID=74AHCT1G126SE-7, DigiKey-Purchase-URL=https://snapeda.com/shop?store=DigiKey&id=139076, MF="Diodes Inc.", MP=74AHCT1G126SE-7, Pin Count=5, Price=None, SnapEDA_Link=https://www.snapeda.com/parts/74AHCT1G126SE-7/Diodes%20Inc./view-part/139076/?ref=snap, Source=SnapEDAsch.SchLib
X1: library part CMP-003-00017-2, "Ceramic SMD Crystal, 16 MHz, +/- 20 ppm, 18 pF, -20 to 70 degC, 4-Pin SMD, RoHS, Tape and Reel", Case/Package=CSMD, Frequency=16MHz, Frequency Tolerance=20ppm, Load Capacitance=18pF, Manufacturer=Abracon, Max Operating Temperature=70°C, Min Operating Temperature=-20°C, Package Description="4-Pin Surface Mount Device, Body 5 x 3.2 mm", Package Quantity=1000, Package Reference=ABM3B, Resistance=50Ohm, Datasheet URL=http://www.abracon.com/Resonators/abm3b.pdf, Datasheet Version=Aug-15, ESR=50, Manufacturer URL=http://www.abracon.com/, Mounting Technology=SM, Packaging=TapeandReel, Pins=4, RoHS Compliant=True, Tolerance=20ppm

## Free pads (board coordinates)
  round 0 hole 2.75 unplated paste-10 mask+3.1: MNT(3.5,3.5) MNT(3.5,52.5) MNT(61.5,3.5) MNT(61.5,52.5)

## Via types
v1: diameter 0.5, hole 0.25, Top Layer to Bottom Layer, tented both sides, 113 vias
v2: diameter 0.504, hole 0.25, Top Layer to Bottom Layer, tented both sides, 24 vias
v3: diameter 0.7, hole 0.3, Top Layer to Bottom Layer, tented both sides, 18 vias

## Nets (pads, with @x,y where several pads share a name; then routed paths per layer and width w, separated by ;. In a path a pad name is that pad's centre, name@x,y a point inside that pad or via, vN(x,y) a via of type N, cw(c..) or ccw(c..) an arc to the next point about the centre after c; other vN are vias at no path point)
3V3: C7.2 C8.2 D1.A D2.A J1.1 J1.17 J5.2 R4.2 R5.2 R6.2 R7.2 R8.2 R9.2 U2.8 U3.20 | length 96.2
  Top Layer w0.254: J5.2 2.952,42.85 3.3,43.198 3.3,43.595 v2(4.905,45.2) ; v3(26.7,40.1) 26.7,41.9 30,45.2 ; 31.65,43.55 v3(33.1,45) ; v2(40,42.3) 40,43
  Top Layer w0.5: J1.17 28.69,46.51 30,45.2 31.65,43.55 33.4,41.8 34.8,41.8 36,43 40,43 58.1,43 59,42.1 60.6,42.1 62.1,40.6 62.1,36 v3(63.1,35)
  Bottom Layer w0.254: R5.2 4.905,46.4 ; R4.2 4.7,47.8 4.905,47.595 4.905,46.4 ; J1.1 8.37,45.495 C7.2 5.088,43.625 4.905,43.808 U2.8 v2(4.905,45.2) 4.905,46.4 ; v3(26.7,40.1) 27.25,39.55 R8.2 R9.2 ; v3(33.1,45) R7.2 ; U3.20 37.921,40.48 38.066,40.625 C8.2 v2(40,42.3) 40.75,43.05 R6.2 ; D2.A 62.5,30 63.1,30.6 v3(63.1,35) D1.A
5V: C1.1 C9.2 J1.2 J1.4 J6A.A4-B9 J6A.B4-A9 Q3A.2 Q3B.2 R15.2 R16.2 R25A.2 R25B.2 U4.5 | length 63.9
  Top Layer w0.254: v2(21.3,34.5) 25.7,34.5 29.5,30.7 36.6,30.7 40.4,34.5 v3(41.75,34.5)
  Top Layer w0.508: 9.3,34.5 v2(21.3,34.5)
  Bottom Layer w0.254: v2(5.506,25.5) 5.554,25.548 5.554,25.679 C9.2 6.34,26.535 U4.5 ; R25B.2 12.69,31.25 Q3B.2 15.14,33.7 15.3,33.7 15.704,34.104 18.452,34.104 19.003,33.553 ; R25A.2 20.1,31.25 21.3,32.45 v2(21.3,34.5) ; R16.2 v3(41.75,34.5) R15.2
  Bottom Layer w0.508: J6A.A4-B9 7.28,10.62 v2(7.3,10.6) ; J6A.B4-A9 7.28,15.42 v2(7.3,15.4) ; Q3A.2 18.096,32.656 18.106,32.656 19.003,33.553 19.9,34.45 C1.1 21.25,34.45 v2(21.3,34.5)
A_N: R1.2 U1.30 | length 11.1
  Bottom Layer w0.254: R1.2 12.748,13.042 13.205,13.042 13.271,13.108 13.349,13.108 14.915,14.675 19.644,14.675 21.377,16.408 21.377,16.476 21.931,17.03 U1.30@21.931,17.169
A_P: R2.2 U1.29 | length 11.1
  Bottom Layer w0.254: R2.2 13.642,12.148 13.642,12.605 13.708,12.671 13.708,12.749 15.126,14.167 19.854,14.167 21.736,16.049 21.804,16.049 22.358,16.603 U1.29@22.497,16.603
"AVR Activity": D4.A U1.22 | length 43.8
  Top Layer w0.254: v2(42.9,28.3) v2(43.9,27.3)
  Bottom Layer w0.254: U1.22@27.829,15.472 29,14.3 31.6,14.3 33.7,16.4 33.7,18.2 42.9,27.4 v2(42.9,28.3) ; v2(43.9,27.3) 60.8,27.3 61.51,26.59 D4.A
"AVR Clock": C6.2 U1.1 U4.4 X1.3 | length 24.7
  Bottom Layer w0.254: X1.3 6.8,20.3 7.7,21.2 8.246,21.746 ; U4.4 7.66,27.654 7.814,27.5 8.6,27.5 9,27.1 9,25.6 8.554,25.154 8.495,25.154 8.346,25.005 8.346,24.946 8,24.6 8,21.992 8.246,21.746 ; C6.2 11,21.746 ; U1.1@20.8,20.237 19.291,21.746 11,21.746 ; 8.246,21.746 11,21.746
"AVR Rx": R11.2 U1.8 | length 6.7
  Bottom Layer w0.254: U1.8@24.76,24.197 24.427,24.53 24.427,25.127 28,28.7 R11.2
"AVR Tx": R8.1 U1.9 U3.6 | length 23.4
  Top Layer w0.254: v3(30.1,38.5) 32.115,36.485 32.615,36.485 v3(32.7,36.4)
  Bottom Layer w0.254: U1.9@26.697,24.197 29.8,27.3 29.8,33.5 v3(32.7,36.4) 34,36.4 34.67,35.73 U3.6 ; R8.1 v3(30.1,38.5)
"AVR USB Enable": J1.12 Q4B.1 R27B.2 | length 26.6
  Top Layer w0.254: v2(15,40.9) 19.8,40.9 22.3,43.4 22.3,52.54 J1.12
  Bottom Layer w0.254: Q4B.1 12.05,37.3 R27B.2 12.25,39.45 13.7,40.9 v2(15,40.9)
"AVR VCC Enable": J1.13 Q4A.1 R27A.2 | length 20.7
  Top Layer w0.254: v2(17.1,39.8) 20.2,39.8 23.61,43.21 J1.13
  Bottom Layer w0.254: Q4A.1 16.05,37.3 R27A.2 16.25,38.95 v2(17.1,39.8)
"Clock Override": J1.7 U4.2 | length 32.4
  Bottom Layer w0.254: U4.2 7,35.1 13.321,41.421 15.521,41.421 16,41.9 16,45.6 12.421,49.179 12.421,51.656 13.024,52.259 14.961,52.259 J1.7
"Clock Override Enable": J1.11 R28.2 U4.1 | length 31.1
  Top Layer w0.254: v2(15.1,42) 19.4,42 21.1,43.7 21.1,51.2 J1.11
  Bottom Layer w0.254: U4.1 6.34,35.34 13,42 v2(15.1,42)
DA_N: J6A.A7 J6A.B7
DA_P: J6A.A6 J6A.B6
DB_N: J6B.A7 J6B.B7 J7.2 R1.1 | length 10.6
  Top Layer w0.254: v2(10.944,6.9) v2(12,6.9)
  Bottom Layer w0.254: J6B.A7 10.942,5.864 10.942,10.701 11.692,11.451 11.692,11.529 11.758,11.595 11.758,12.052 R1.1 ; J7.2 11.923,4.148 11.923,5.048 11.944,5.068 11.944,5.43 11.95,5.437 J6B.B7 11.975,5.881 11.975,6.875 v2(12,6.9)
DB_P: J6B.A6 J6B.B6 J7.3 R2.1 | length 9.5
  Bottom Layer w0.254: J6B.B6 10.475,5.83 10.475,5.331 10.544,5.263 10.544,5.179 10.692,5.03 11.11,5.03 ; J7.3 11.2,4.941 11.11,5.03 ; R2.1 12.652,11.158 12.195,11.158 12.129,11.092 12.051,11.092 11.45,10.491 J6B.A6 11.45,5.273 11.208,5.03 11.11,5.03
Device_MISO: J3.1 J4.1 U1.17 U3.17 | length 39
  Top Layer w0.254: v2(31.5,16.5) 31.5,15.9 33.32,14.08 J3.1 34.6,11.56 34.6,9.04 J4.1
  Bottom Layer w0.254: U1.17@30.992,17.968 31.5,17.46 ; v2(31.5,16.5) 31.5,17.46 ; U3.17 35.965,38.635 38.9,35.7 38.9,24.86 31.5,17.46
Device_MOSI: J3.4 J4.4 R13.2 U1.16 | length 23.5
  Top Layer w0.254: v2(32.3,19.8) 32.3,16.3 34.6,14 34.6,12.5 35.86,11.24 J4.4
  Bottom Layer w0.254: U1.16@30.657,20.237 31.61,21.19 ; v2(32.3,19.8) 32.3,20.5 31.61,21.19 ; R13.2 34.95,29.3 34,28.35 34,23.58 31.61,21.19
Device_SCLK: J3.3 J4.3 R14.2 U1.15 | length 26.6
  Top Layer w0.254: v2(31.4,22.1) 33,20.5 33,16.7 35.86,13.84 J3.3 36.9,11.8 36.9,8.8 J4.3
  Bottom Layer w0.254: U1.15@30.091,20.803 32.3,23.012 32.3,27.9 32,28.2 R14.2
GND: C1.2 C2.1 C3.1 C4.2 C5.1 C6.1 C7.1 C8.1 C9.1 J1.6 J1.9 J1.14 J1.20 J1.25 J1.30 J1.34 J1.39 J3.6 J4.6 J6A.A1-B12 J6A.B1-A12 J6B.A1-B12 J6B.B1-A12 J7.5 J7.S1 J7.S2 J7.S3 J7.S4 J7.S5 J7.S6 Q1.2 Q2.2 Q4A.2 Q4B.2 R21.1 R23.1 R24.1 R26A.1 R26B.1 R27A.1 R27B.1 R28.1 R29.1 R30.1 U1.3 U1.28 U2.1 U2.2 U2.3 U2.4 U3.2 U3.4 U3.10 U3.11 U4.3 X1.2 X1.4 | length 2.1
  Bottom Layer w0.254: 7,28.3 7,27.599 7.277,27.322 7.277,26.848 C9.1
  other v1: 18,3 21,3 24,3 27,3 30,3 33,3 36,3 39,3 42,3 48,3 51,3 54,3 57,3 16.5,6 19.5,6 22.5,6 25.5,6 28.5,6 31.5,6 34.5,6 37.5,6 40.5,6 49.5,6 52.5,6 55.5,6 58.5,6 15,9 18,9 21,9 24,9 27,9 30,9 33,9 36,9 39,9 42,9 48,9 63,9 16.5,12 19.5,12 22.5,12 28.5,12 31.5,12 40.5,12 30,15 36,15 39,15 42,15 48,15 63,15 19.5,18 28.5,18 37.5,18 40.5,18 18,21 27,21 39,21 42,21 45,21 48,21 63,21 16.5,24 22.5,24 43.5,24 46.5,24 49.5,24 52.5,24 55.5,24 24,27 33,27 36,27 63,27 22.5,30 28.5,30 31.5,30 34.5,30 37.5,30 40.5,30 43.5,30 45,33 48,33 54,33 57,33 60,33 22.5,36 25.5,36 40.5,36 52.5,36 55.5,36 15,39 18,39 21,39 42,39 45,39 48,39 57,39 63,39 37.5,42 43.5,42 46.5,42 52.5,42 55.5,42 42,45 45,45 16.5,48 25.5,48 40.5,48 46.5,48 52.5,48 55.5,48 30,51 37.5,54 58.5,54
GPIO2: J1.3 R19.1 R20.2 | length 24.1
  Top Layer w0.254: v2(15.2,45.3) 16.2,46.3 v2(17.6,46.3)
  Bottom Layer w0.254: J1.3 10.91,49.59 v2(15.2,45.3) ; v2(17.6,46.3) 21.1,46.3 21.8,45.6 21.8,45 ; R19.1 21.8,45 ; R20.2 23.5,40.8 21.8,42.5 21.8,45
GPIO3: J1.5 R19.2 | length 9.5
  Bottom Layer w0.254: J1.5 13.45,49.25 17.7,45 R19.2
GPIO5: J1.29 R6.1 U3.19 | length 16.3
  Bottom Layer w0.254: U3.19 37.286,40.48 37.337,40.531 37.34,40.531 37.489,40.679 37.489,40.763 38.4,41.674 38.4,45 ; R6.1 38.4,45 ; J1.29 43.93,49.03 41.1,46.2 38.7,46.2 38.4,45.9 38.4,45
GPIO6: J1.31
GPIO7: J1.26
GPIO8: J1.24 R7.1 U3.1 | length 22
  Top Layer w0.254: v3(36.7,41.5) 36.7,38 37.6,37.1 v3(37.6,35.8)
  Bottom Layer w0.254: R7.1 36.7,45 ; J1.24 37.512,52.568 37.512,48.412 36.7,47.6 36.7,45 ; v3(36.7,41.5) 36.7,45 ; v3(37.6,35.8) 37.6,35.679 37.921,35.358 U3.1
GPIO9: J1.21 R12.1 | length 7.5
  Bottom Layer w0.254: R12.1 30.75,46.55 33.77,49.57 J1.21
GPIO10: J1.19 U3.15 | length 12.7
  Top Layer w0.254: J1.19 31.23,48.97 34.1,46.1 v3(34.1,43.3)
  Bottom Layer w0.254: v3(34.1,43.3) 34.67,42.73 U3.15
GPIO11: J1.23 U3.13 | length 13.4
  Bottom Layer w0.254: U3.13 33.374,41.826 32.323,42.877 32.323,45.823 36.31,49.81 J1.23
GPIO12: J1.32
GPIO13: J1.33 Q2.1 R22.1 | length 14.7
  Bottom Layer w0.254: J1.33 49.01,46.81 48.1,45.9 48.1,45 ; Q2.1 49.05,42.75 48.1,43.7 48.1,45 ; R22.1 48.1,45
GPIO14: J1.8 R9.1 U3.8 | length 34.9
  Top Layer w0.254: v3(27.9,40.7) 28.8,39.8 v3(28.8,35.1) 31.7,32.2 v3(32.8,32.2)
  Bottom Layer w0.254: J1.8 17.328,52.432 17.328,49.672 19.3,47.7 21.2,47.7 22.6,46.3 22.6,44.1 24.6,42.1 26.5,42.1 v3(27.9,40.7) ; R9.1 28.8,36.45 v3(28.8,35.1) ; v3(32.8,32.2) 33.374,32.774 U3.8
GPIO15: J1.10 R10.1 | length 11.1
  Bottom Layer w0.254: J1.10 19.868,52.432 19.868,50.732 24.25,46.35 R10.1
GPIO16: J1.36
GPIO19: J1.35 R21.2 R22.2 | length 9.7
  Bottom Layer w0.254: R22.2 51.55,45 ; J1.35 51.55,45 ; R21.2 51.55,45
GPIO20: J1.38
GPIO21: J1.40
GPIO22: J1.15
GPIO23: J1.16
GPIO24: J1.18
GPIO25: J1.22
GPIO26: D3.A J1.37 | length 15.4
  Bottom Layer w0.254: J1.37 56.9,48.42 56.9,44.2 59.3,41.8 61.2,41.8 61.51,41.49 D3.A
HWB: R20.1 U1.13 | length 18.8
  Top Layer w0.254: v3(25.9,30.6) 30.9,25.6 v3(31,25.6)
  Bottom Layer w0.254: R20.1 23.5,33 v3(25.9,30.6) ; U1.13@28.96,21.935 31,23.975 v3(31,25.6)
ID_SC: J1.28 R5.1 U2.6 | length 53.7
  Top Layer w0.254: v2(4.2,42.7) 6.8,45.3 6.8,54.4 7.8,55.4 39.76,55.4 J1.28
  Bottom Layer w0.254: R5.1 2.365,46.215 U2.6 2.365,43.325 2.99,42.7 v2(4.2,42.7)
ID_SD: J1.27 R4.1 U2.5 | length 53.8
  Top Layer w0.3: J1.27@41.375,51.215 J1.27
  Bottom Layer w0.254: U2.5 1.095,47.195 1.7,47.8 ; R4.1 1.7,47.8 ; J1.27 40.188,52.432 40.188,54.972 39.76,55.4 8,55.4 7,54.4 7,50.6 5.3,48.9 2,48.9 1.7,48.6 1.7,47.8
NetC4_1: C4.1 U1.27 | length 6.3
  Bottom Layer w0.5: C4.1 21.125,12.968 U1.27@23.628,15.472
NetC5_2: C5.2 R3.1 X1.1 | length 5.1
  Bottom Layer w0.254: X1.1 9.2,23.7 10.6,22.3 11,22.3 ; C5.2 11,22.3 ; R3.1 11.85,22.3 11,22.3
NetD1_C: D1.C R17.2 | length 2.7
  Bottom Layer w0.254: R17.2 D1.C
NetD2_C: D2.C R18.2 | length 2.7
  Bottom Layer w0.254: R18.2 D2.C
NetD3_C: D3.C R23.2 | length 2.7
  Bottom Layer w0.254: R23.2 D3.C
NetD4_C: D4.C R24.2 | length 2.7
  Bottom Layer w0.254: R24.2 D4.C
NetJ5_1: J5.1 U2.7 | length 3.2
  Top Layer w0.254: J5.1 2.55,43.85 3.352,44.652 3.352,45.152 v2(3.4,45.2)
  Bottom Layer w0.254: v2(3.4,45.2) 3.4,45.171 3.635,44.936 U2.7
NetJ6A_A5: J6A.A5 R30.2 | length 2.2
  Bottom Layer w0.254: J6A.A5 8.02,11.77 R30.2
NetJ6A_B5: J6A.B5 R29.2 | length 2.2
  Bottom Layer w0.254: J6A.B5 7.98,14.77 R29.2
NetJ6B_A4-B9: J6B.A4-B9 J6B.B4-A9
NetJ6B_A5: J6B.A5
NetJ6B_B5: J6B.B5
NetJ7_1: J7.1
NetQ1_1: Q1.1 Q2.3 R15.1 R17.1 | length 14.6
  Bottom Layer w0.254: R15.1 45.3,36.5 46.8,35 49.1,35 ; Q1.1 49.05,34.95 49.1,35 ; Q2.3 50,35 ; R17.1 50,35 ; 49.1,35 50,35
NetQ3A_1: Q3A.1 Q4A.3 R25A.1 | length 6.3
  Bottom Layer w0.254: Q3A.1 16.86,32.51 17,32.65 ; Q4A.3 17,32.65 ; R25A.1 19.9,32.75 19.45,32.3 19.4,32.3 18.705,31.605 17.195,31.605 17,31.8 17,32.65
NetQ3B_1: Q3B.1 Q4B.3 R25B.1 | length 4.3
  Bottom Layer w0.254: R25B.1 10.1,32.75 10.85,33.5 12.1,33.5 ; Q3B.1 12.05,33.45 12.1,33.5 ; Q4B.3 12.1,33.5
NetR3_2: R3.2 U1.2 | length 8.5
  Bottom Layer w0.254: R3.2 19.669,22.5 U1.2@21.366,20.803
NetR10_2: R10.2 U3.14 | length 13.7
  Top Layer w0.254: v3(30.4,40.7) 30.45,40.7 33.55,37.6 v3(33.6,37.6)
  Bottom Layer w0.254: R10.2 26.6,45 27.6,44 27.6,43.5 v3(30.4,40.7) ; v3(33.6,37.6) 33.6,37.721 34.035,38.155 U3.14
NetR11_1: R11.1 U3.12 | length 11.2
  Bottom Layer w0.254: R11.1 28,32.8 32.714,37.514 U3.12
NetR12_2: R12.2 U3.3 | length 14
  Top Layer w0.254: v3(29.9,42.8) 29.95,42.8 35.95,36.8 v3(36,36.8)
  Bottom Layer w0.254: R12.2 29.25,43.45 v3(29.9,42.8) ; v3(36,36.8) 36.626,36.174 U3.3
NetR13_1: R13.1 U3.5 | length 3.5
  Bottom Layer w0.254: R13.1 35.05,30.7 35.253,30.903 35.253,30.953 35.33,31.03 U3.5
NetR14_1: R14.1 U3.7 | length 4.9
  Bottom Layer w0.254: R14.1 33.1,30.7 34.035,31.635 U3.7
Reset: J3.5 J4.5 Q1.3 R16.1 R18.1 U1.24 | length 53
  Top Layer w0.254: J4.5 37.3,8.86 37.3,11.74 J3.5
  Bottom Layer w0.254: U1.24@26.697,14.34 27.937,13.1 31.7,13.1 34.4,15.8 ; J3.5 37.36,12.84 34.4,15.8 ; R16.1 43.523,32.127 43.523,31.977 45.5,30 ; Q1.3 50,30.125 49.875,30 ; R18.1 50,30 49.875,30 ; 34.4,15.8 34.4,18.361 43.281,27.242 43.281,27.781 45.5,30 ; 45.5,30 49.875,30
UVCC: C3.2 Q3B.3 R26B.2 U1.31 | length 26
  Top Layer w0.305: v2(14.6,20.4) v2(14.6,25.8)
  Bottom Layer w0.305: R26B.2 12.95,29.25 13,29.3 ; Q3B.3 13,29.3 ; v2(14.6,20.4) 13.6,20.4 13.2,20 C3.2 15.075,18.825 17.2,16.7 20.302,16.7 U1.31@21.336,17.734 ; v2(14.6,25.8) 13,27.4 13,29.3
  Bottom Layer w0.508: U1.31@21.336,17.734 U1.31@21.366,17.734
VCC: C2.2 J3.2 J4.2 Q3A.3 R26A.2 U1.4 U1.32 | length 37.4
  Top Layer w0.254: v2(26,11.9) v2(26,19.1)
  Bottom Layer w0.254: 17.013,29.095 17.167,29.25 R26A.2 ; U1.32@20.8,18.3 23.2,20.7 ; U1.4@22.497,21.935 23.2,21.232 23.2,20.7 ; v2(26,11.9) 27.6,10.3 J4.2 ; v2(26,19.1) 24.4,20.7 23.2,20.7
  Bottom Layer w0.5: Q3A.3 17.013,30.477 17.013,29.095 17.013,27.712 C2.2 17.25,27.475 17.25,27.182 U1.4@22.497,21.935
pads on no net: J2.1 J2.2 J2.3 J2.4 J6A.13 J6A.14 J6A.15 J6A.16 J6A.17 J6A.18 J6A.A8 J6A.B8 J6A.S_1_H1 J6A.S_1_H2 J6A.S_2_H1 J6A.S_2_H2 J6A.S_3_H1 J6A.S_3_H2 J6A.S_4_H1 J6A.S_4_H2 J6B.13 J6B.14 J6B.15 J6B.16 J6B.17 J6B.18 J6B.A8 J6B.B8 J6B.S_1_H1 J6B.S_1_H2 J6B.S_2_H1 J6B.S_2_H2 J6B.S_3_H1 J6B.S_3_H2 J6B.S_4_H1 J6B.S_4_H2 J7.4 U1.5 U1.6 U1.7 U1.10 U1.11 U1.12 U1.14 U1.18 U1.19 U1.20 U1.21 U1.23 U1.25 U1.26 U3.9 U3.16 U3.18

## Polygon pours and split planes (outlines as drawn)
GND on Top Layer "Top Layer-GND" (solid, remove dead copper, pour order 5): -1,57.4 65.7,57.4 65.7,-0.5 -1,-0.5
5V on Top Layer "Top Layer-5V" (solid, remove dead copper, pour order 3): -1,57.4 14.2,57.4 14.2,-0.5 -1,-0.5
GND on Bottom Layer "Bottom Layer-GND" (solid, remove dead copper, pour order 4): -1,57.4 65.7,57.4 65.7,-0.5 -1,-0.5

## Keep-outs
Keep-Out Layer:
  circle w0.1: c3.5,52.5 r2.85
  circle w0.1: c61.5,52.5 r2.85
  circle w0.1: c61.5,3.5 r2.85
  circle w0.1: c3.5,3.5 r2.8
  lines w0.1: 0,3 ccw(c3,3) 3,0 62,0 ccw(c62,3) 65,3 65,53 ccw(c62,53) 62,56 3,56 ccw(c3,53) 0,53 0,37.5 ccw(c1,37.5) 1,36.5 4,36.5 cw(c4,35.5) 5,35.5 5,20.5 cw(c4,20.5) 4,19.5 1,19.5 ccw(c1,18.5) 0,18.5 0,3

## Other copper
Top Layer:
  text "CAT" at 54.81,0.993 h2
Bottom Layer:
  text "CAT" at 58.19,0.993 h2

## Silkscreen, mask and mechanical layers (free items; w line width, h text height)
Top Overlay:
  drawing of 614 lines, arcs and shapes, not listed
  text "Short      to / lock EEPROM" at 0.491,48 h1.52 r270
  text "Test Activity" at 39.324,39.095 h4
  text "GPIO26" at 63.48,37.645 h1.5 r90
  text "Running" at 45.69,34.095 h4
  text "GPIO13" at 63.479,30.145 h1.5 r90
  text "Reset" at 49.456,28.739 h4
  text "PC7" at 63.48,23.779 h1.5 r90
  text "LED" at 51.991,23.719 h4
  text "Power" at 0.321,15.728 h2 r270
  text "ATmega8u2 / Default fuses / E: F0 (or 00) / H: D8 / L: DE" at 28.8,14.9 h1.52
  text "MISO" at 33.62,14 h1 r90
  text "SCLK" at 36.22,14 h1 r90
  text "Reset" at 38.715,14 h1 r90
  text "5V" at 34.404,10.919 h1 r75
  text "MOSI" at 36.909,10.917 h1 r75
  text "GND" at 39.409,10.917 h1 r75
  text "• ISP / • USB / • GPIO / • Serial / • Clock / • Bootloader" at 22.3,6 h2
  text "TEST" at 7.719,3.984 h7 r15
  text ".Print_Date" at 48.523,3.827 h1.5
  text "Tom Sawyer Labs" at 31.297,0.907 h3
  text "HAT" at 16.7,0.4 h8
  text "USB" at 9.422,0.323 h2
Outline:
  lines w0.1: 0,3 ccw(c3,3) 3,0 62,0 ccw(c62,3) 65,3 65,53 ccw(c62,53) 62,56 3,56 ccw(c3,53) 0,53 0,37.5 ccw(c1,37.5) 1,36.5 4,36.5 cw(c4,35.5) 5,35.5 5,20.5 cw(c4,20.5) 4,19.5 1,19.5 ccw(c1,18.5) 0,18.5 0,3 ; 44,4 ccw(c45,4) 46,4 46,19 ccw(c45,19) 44,19 44,4

## Text inside footprints (layer, text, board x,y; h text height)
J7: 3D Bottom "PCB END" at 6.35,0.2 h0.41